# Altium PCB adau1979-fpga.PcbDoc (part 8 of 10)
Units mil, origin at the board's own origin, x right, y up, seen from the top; angles counter-clockwise.
Board outline 7874.02 x 9055.12 mil, 4 copper layers (Top Layer, GND, POWER, Bottom Layer), stack 23.756 mil thick; 636 components, 457 nets, 2015 pads, 4184 vias.
Unrouted connection lines stored in the file: 10.
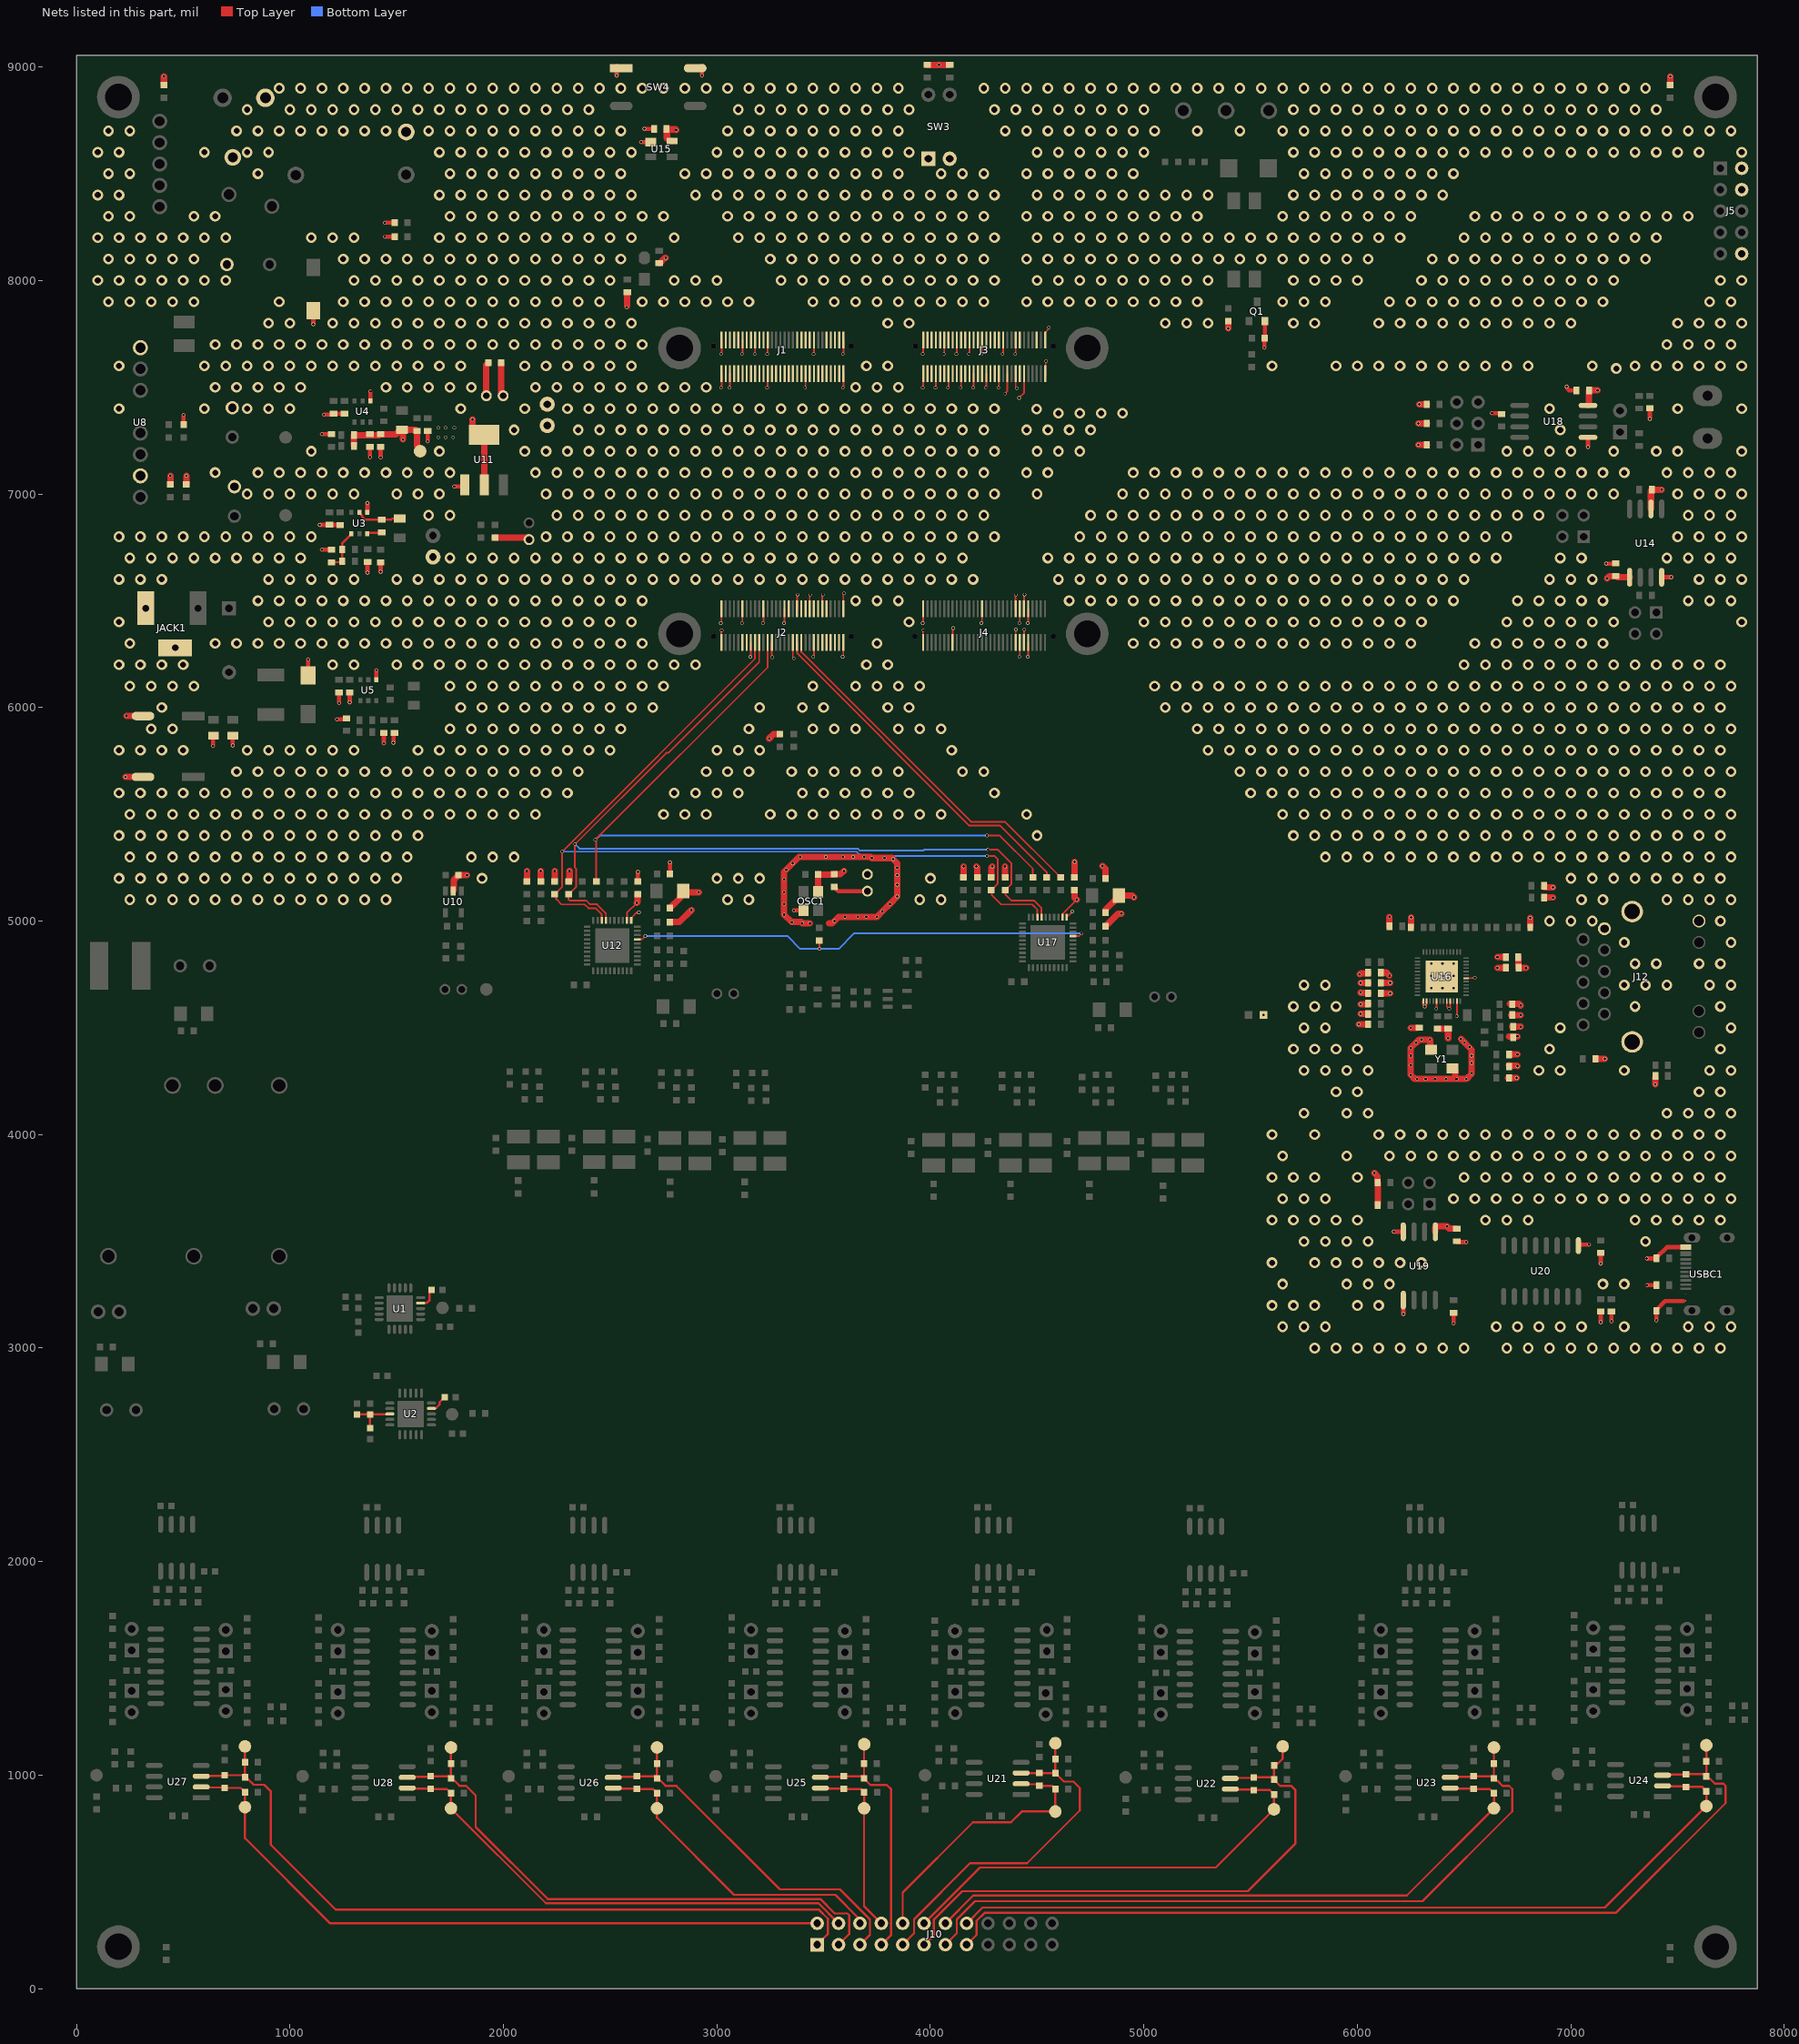
[diagram p7: the nets of this part, all layers, seen from the top]

## Via types
v1: diameter 50, hole 28, Top Layer to Bottom Layer, 3377 vias
v2: diameter 16, hole 12, Top Layer to Bottom Layer, 784 vias
v3: diameter 20, hole 12, Top Layer to Bottom Layer, 14 vias
v4: diameter 16, hole 8, Top Layer to Bottom Layer, 9 vias

## Nets (pads, with @x,y where several pads share a name; then routed paths per layer and width w, separated by ;. In a path a pad name is that pad's centre, name@x,y a point inside that pad or via, vN(x,y) a via of type N, cw(c..) or ccw(c..) an arc to the next point about the centre after c; other vN are vias at no path point) (continued)
GND: C9.1 C10.1 C11.1 C12.1 C14.2 C15.2 C16.1 C17.1 C20.1 C21.1 C22.1 C23.1 C24.1 C25.1 C26.1 C27.1 C38.1 C42.1 C43.2 C44.2 C45.2 C46.2 C47.2 C48.2 C49.1 C50.2 C52.2 C53.1 C54.2 C55.2 C56.2 C57.2 C75.1 C77.1 C78.2 C84.1 C85.1 C86.1 C89.1 C90.1 C91.1 C92.1 C93.1 C94.1 C96.1 C102.1 C103.1 C104.1 C105.1 C106.1 C110.1 C111.1 C113.1 C116.2 C118.1 C119.2 C125.1 C127.1 C128.1 C129.2 C130.2 C132.1 C133.1 C135.1 D1.1 D3.2 J1.1@3592.49,7721.69 J1.2 J1.15 J1.20 J1.37 J1.38 J1.43 J1.49 J1.56 J1.59 J1.60 J2.1@3591.97,6304.37 J2.2 J2.12 J2.15 J2.18 J2.24 J2.25 J2.30 J2.35 J2.40 J2.43 J2.45 J2.50 J2.59 J2.60 J3.1@4537.37,7721.69 J3.2 J3.12 J3.15 J3.16 J3.20 J3.21 J3.24 J3.30 J3.31 J3.36 J3.37 J3.42 J3.43 J3.48 J3.49 J3.54 J3.59 J3.60 J4.9 J4.10 J4.11 J4.12 J4.13 J4.14 J4.15 J4.16 J4.32 J4.45 J4.59 J4.60 J5.2 J5.10 J6.2 J7.2 J12.10 J12.15 J12.16 JACK1.2 JACK1.3 L6.2 LED1.2 OSC1.2 P2.1 Q1.2 R10.2 R11.1 R12.2 R17.1 R18.1 R22.1 R25.2 R40.2 R46.1 R69.1 R74.1 R75.1 R81.2 R93.1 R95.1 R99.1 R106.2 R110.2 R115.2 R120.2 R121.2 R123.1 SW3.1 SW3.2 SW4.1 SW4.4 U3.1 U4.1 U5.1 U8.1 U8.7 U10.2 U11.1 U12.11 U12.18 U14.2 U14.8 U15.1 U16.47 U16.49 U17.11 U17.18 U18.5 U19.4 U19.5 U20.1 USBC1.A1B12 USBC1.B1A12 Y1.2 Y1.4 | length 15673
  Top Layer w8: U12.18@2460.8,5003.2 2460.8,5030.3 2430.99,5060.12 2398.54,5060.12 2380.74,5077.92 2272.08,5077.92 2247.2,5102.8 2247.2,5117.88 R40.2@2240,5125.08 2240.79,5125.08 2251.75,5136.04 2251.75,5136.83 2275.25,5160.33 2275.25,5324.75 v2(2275,5325) 2275,5325.46 3178.58,6229.04 J2.43@3178.58,6304.37 ; U12.11@2598.6,5003.2 2600.1,5004.7 2600.1,5014.95 2623.62,5038.47 2633.47,5038.47 v2(2635,5040) ; J2.59@3020,6295 v2@3020,6357.21 ; v2@3021.1,6399.64 J2.60@3021.1,6461.85 ; v2@3021.62,7502 J1.60@3021.62,7564.21 ; v2@3021.62,7659.48 J1.59@3021.62,7721.69 ; v2@3060.99,7502 J1.56@3060.99,7564.21 ; v2@3119.53,6399.64 J2.50@3119.53,6461.85 ; v2@3120.05,7659.48 J1.49@3120.05,7721.69 ; v2@3158.9,6242.16 J2.45@3158.9,6304.37 ; v2@3179.1,7659.48 J1.43@3179.1,7721.69 ; v2@3217.95,6399.64 J2.40@3217.95,6461.85 ; v2@3238.16,7502 J1.38@3238.16,7564.21 ; v2@3238.16,7659.48 J1.37@3238.16,7721.69 ; J2.35@3257.32,6304.37 3257.32,6239.84 3260,6237.16 v2(3260,6235) ; v2@3316.38,6399.64 J2.30@3316.38,6461.85 ; J2.25@3355.75,6304.37 3355.75,6236.41 3360,6232.16 v2(3360,6230) ; J2.24@3375.43,6461.85 v2@3375.43,6524.06 ; v2@3415.32,7502 J1.20@3415.32,7564.21 ; J2.18@3434.49,6461.85 v2@3434.49,6524.06 ; v2@3454.17,6242.16 J2.15@3454.17,6304.37 ; v2@3454.69,7659.48 J1.15@3454.69,7721.69 ; J2.12@3493.54,6461.85 v2@3493.54,6524.06 ; v2@3591.97,6242.16 J2.1@3591.97,6304.37 ; J2.2@3591.97,6461.85 3591.97,6529.81 3595,6532.84 v2(3595,6535) ; v2@3592.49,7502 J1.2@3592.49,7564.21 ; v2@3592.49,7659.48 J1.1@3592.49,7721.69 ; J4.59@3965,6295 v2@3965,6357.21 ; v2@3965.98,6399.64 J4.60@3965.98,6461.85 ; v2@3966.5,7502 J3.60@3966.5,7564.21 ; v2@3966.5,7659.48 J3.59@3966.5,7721.69 ; v2@4025.56,7502 J3.54@4025.56,7564.21 ; v2@4064.93,7659.48 J3.49@4064.93,7721.69 ; v2@4084.61,7502 J3.48@4084.61,7564.21 ; J4.45@4103.78,6304.37 v2@4103.78,6366.58 ; v2@4123.98,7659.48 J3.43@4123.98,7721.69 ; v2@4143.67,7502 J3.42@4143.67,7564.21 ; v2@4183.04,7659.48 J3.37@4183.04,7721.69 ; v2@4202.72,7502 J3.36@4202.72,7564.21 ; v2@4241.57,6399.64 J4.32@4241.57,6461.85 ; v2@4242.09,7659.48 J3.31@4242.09,7721.69 ; v2@4261.78,7502 J3.30@4261.78,7564.21 ; v2(4265,5305) 4300,5305 4315,5290 4315,5174.29 4285.79,5145.08 R81.2@4285,5145.08 4287.2,5142.88 4287.2,5122.8 4332,5078 4477,5078 4485,5070 4500.6,5054.4 4500.6,5018.4 U17.18@4500.8,5018.2 ; v2@4320.83,7502 J3.24@4320.83,7564.21 ; v2@4340.52,7659.48 J3.21@4340.52,7721.69 ; v2(4350,7470) 4350,7472.16 4360.2,7482.36 J3.20@4360.2,7564.21 ; J4.15@4399.05,6304.37 4399.52,6304.85 4399.52,6364.52 v2(4400,6365) ; J4.16@4399.05,6461.85 v2@4399.05,6524.06 ; J3.16@4399.57,7564.21 4399.57,7502.6 4405,7497.16 v2(4405,7495) ; v2@4399.57,7659.48 J3.15@4399.57,7721.69 ; v2(4415,7450) 4438.94,7473.94 J3.12@4438.94,7564.21 ; v2@4418.74,6242.16 J4.13@4418.74,6304.37 ; v2@4418.74,6399.64 J4.14@4418.74,6461.85 ; J4.11@4438.42,6304.37 4439.21,6305.16 4439.21,6364.21 v2(4440,6365) ; J4.12@4438.42,6461.85 v2@4438.42,6524.06 ; v2@4458.11,6242.16 J4.9@4458.11,6304.37 ; v2@4458.11,6399.64 J4.10@4458.11,6461.85 ; J3.1@4537.49,7729.16 4537.49,7756.27 4553.47,7772.24 4553.47,7778.47 v2(4555,7780) ; J3.2@4540,7555 v2@4540,7617.21 ; U17.11@4638.6,5018.2 v2@4665,5044.6 ; v2(6465,4555) 6465.87,4555.87 U16.47@6465.87,4625.53
  Top Layer w20: C48.2@501.75,7324.92 v2(501.75,7370) ; v2(640,5819.92) C16.1@640,5865 ; v2(732.16,5822.52) C17.1@732.16,5867.6 ; D1.1@1085,6180 v2(1085,6225.08) ; v2(1110,7795) D3.2@1110,7849.41 ; v2(1139.92,6855.47) C10.1@1185,6855.47 1185.24,6855.24 1234.76,6855.24 C9.1@1235,6855 ; v2(1149.92,6739.53) R11.1@1195,6739.53 ; v2(1149.92,7280) R17.1@1195,7280 ; v2(1159.92,7372.01) C20.1@1205,7372.01 ; C20.1@1205,7375.94 C21.1@1255,7375.94 ; v2(1220.39,5945) R18.1@1265.47,5945 ; v2(1230,6021.46) C22.1@1230,6066.54 ; v2(1280,6024.92) C23.1@1280,6070 ; U3.1@1362.87,6912.95 v2(1362.87,6958.03) ; v2(1363.2,6631.39) C12.1@1363.2,6676.47 ; v2(1375,7172.4) C24.1@1375,7217.48 ; U4.1@1377.4,7435 v2(1377.4,7480.08) ; U5.1@1404.8,6130 v2(1404.8,6175.08) ; v2(1425,6635.39) C11.1@1425,6680.47 ; v2(1425,7171.93) C25.1@1425,7217.01 ; v2(1440,5831.46) C26.1@1440,5876.54 ; v2(1445,8205) C46.2@1490.08,8205 ; v2(1445,8270) C45.2@1490.08,8270 ; v2(1485,5835.39) C27.1@1485,5880.47 ; v2(1645,7246.46) LED1.2@1645,7291.54 ; v2(1769.92,7035) U11.1@1815,7035 ; v2(2530,8959.92) SW4.1@2530,9005 ; C78.2@2630,5185 v2(2630,5230) ; v2(2644.92,8647.5) U15.1@2690,8647.5 ; v2(2660.39,8710) C89.1@2705.47,8710 ; R69.1@2779.92,5220 2780,5220.08 v2(2780,5275) ; v2(2930,8959.92) SW4.4@2930,9005 ; v2(3360,5050) 3360.44,5050.44 OSC1.2@3405.5,5050.44 ; C53.1@3550,5158.82 3550.79,5158.82 3569.61,5140 C52.2@3705,5140 ; v2(5564.92,7684.92) R22.1@5564.92,7730 5566.16,7731.24 5566.16,7808.49 Q1.2@5567.4,7809.73 ; v2(6169.92,3545) U19.4@6215,3545 ; v2(6215,3159.92) U19.5@6215,3205 ; v2(6450,3116.46) C113.1@6450,3161.54 ; C116.2@6465,3496.54 v2(6510.08,3496.54) ; v2(6629.92,7378.46) R99.1@6675,7378.46 ; v2(6980.39,7503) 6980.39,7496.72 6992.11,7485 C118.1@7025.47,7485 ; U20.1@7040,3485 v2(7085.08,3485) ; v2(7080,7219.92) U18.5@7080,7265 ; v2(7140,3121.46) C129.2@7140,3166.54 ; v2(7140,3396.46) C128.1@7140,3441.54 ; v2(7164.92,6673.78) C77.1@7210,6673.78 ; v2(7190,3125.39) C130.2@7190,3170.47 ; v2(7355.39,3295) R120.2@7400.47,3295 ; v2(7355.39,3420) R121.2@7400.47,3420 7400.47,3423.94 7449.3,3472.76 USBC1.B1A12@7537.04,3472.76 ; v2(7370,7351.93) R106.2@7370,7397.01 ; v2(7400.47,3129.92) R95.1@7400.47,3175 7400.47,3178.94 7441.93,3220.39 7525.94,3220.39 ; U14.8@7425,6610 v2(7470.08,6610)
  Top Layer w30: v2(230,5675) C14.2@311.89,5675 ; v2(235,5960) C15.2@311.89,5960 ; R12.2@410,8923.39 v2(410,8954.92) ; C42.1@440,7044.92 v2(440,7085) ; C50.2@515,7044.92 v2(515,7085) ; U10.2@1765,5141.2 1768.2,5144.4 1768.2,5192.57 1789.92,5214.29 C38.1@1789.92,5215 ; C38.1@1798.39,5214.29 v2(1829.92,5214.29) ; C57.2@1960,6795.08 2105.45,6795.08 2114.27,6786.26 C56.2@2120,6786.26 ; C55.2@1990,7615 1990,7474.47 1998.74,7465.73 C54.2@1998.74,7460 ; v2@2580,7879.33 R46.1@2580,7941.54 ; C90.1@2779.92,5060 2779.92,5060.71 2828.45,5109.24 2828.45,5121 2842.7,5135.25 2842.95,5135 v2(2915,5135) ; v2(3435,4990) v2(3400,4990) 3395,4995 v2(3350,4995) v2(3315,5030) v2(3315,5080) v2(3315,5135) v2(3315,5195) 3315,5230 v2(3325,5240) v2(3355,5270) 3385,5300 v2(3390,5300) v2(3510,5300) v2(3590,5300) v2(3637.5,5300) v2(3690,5300) 3720,5300 v2(3725,5295) v2(3785,5295) 3820,5295 v2(3825,5290) 3845,5270 v2(3845,5250) v2(3845,5215) v2(3845,5170) v2(3845,5115) v2(3810,5080) v2(3775,5045) v2(3750,5020) v2(3700,5020) v2(3660,5020) v2(3600,5020) 3570,5020 v2(3550,5000) 3540,4990 3525,4990 ; C119.2@4675,5205 C119.2@4675,5205 v2(4675,5277) ; v2(4806.23,5258.31) 4819.92,5244.62 R123.1@4819.92,5200 ; C125.1@4819.92,5040 4819.96,5040.04 4819.96,5052.51 4882.7,5115.25 C135.1@4882.7,5120 ; C135.1@4889.21,5119.37 4945.17,5119.37 v2(4953.22,5111.33) ; v2(6006.54,4516.67) R115.2@6038.07,4516.67 ; C102.1@6121.93,4661.67 v2(6153.46,4661.67) ; C103.1@6121.93,4710 v2(6153.46,4710) ; C104.1@6121.93,4758.33 6136.67,4758.33 v2(6150,4745) ; v2(6250,4500.47) R110.2@6281.54,4500.47 ; R74.1@6250.94,4970 v2(6250.94,5017.28) ; Y1.2@6345,4396.61 6340,4401.61 v2(6340,4445) v2(6300,4445) 6290,4445 v2(6250,4405) v2(6250,4370) v2(6250,4325) v2(6250,4279.39) 6269.39,4260 v2(6415,4260) v2(6465,4260) ; C132.1@6375,4495.47 C133.1@6425,4495.47 ; v2(6425,4451.54) C133.1@6425,4483.07 ; Y1.4@6445,4310 6448.94,4310 6457.56,4301.38 6457.56,4267.44 v2(6465,4260) ; v2(6485,4447.43) 6535,4397.43 v2(6535,4335) v2(6535,4287.5) 6535,4285 v2(6510,4260) v2(6465,4260) ; C85.1@6705.59,4265 C85.1@6709.53,4265 v2(6746.06,4265) ; C84.1@6709.53,4325 6709.53,4323.5 6710.75,4322.28 6747.72,4322.28 v2(6750,4320) ; 6709.53,4460 v2(6750,4460) ; C94.1@6714.59,4612.44 6757.56,4612.44 ; C86.1@6718.46,4375 v2(6750,4375) ; C93.1@6720.75,4560 v2(6765,4560) ; C92.1@6724.53,4505 v2(6765,4505) ; C94.1@6724.53,4612.44 6757.56,4612.44 ; C111.1@6754.06,4831.22 6754.29,4830.98 6754.29,4781.46 C110.1@6754.53,4781.22 v2(6789.53,4781.22) ; v2(6765,4605) 6757.56,4612.44 ; R75.1@6810,4972.72 v2(6810,5015) ; C105.1@6875,5110 v2(6915.47,5110) ; C106.1@6875.7,5157.26 v2(6916.17,5157.26) ; C127.1@7126.93,4355 v2(7158.46,4355) ; U14.2@7375,6930 7375,7013.98 7379.53,7018.5 C75.1@7379.53,7020 v2(7424.61,7020) ; v2(7395.47,4235) R93.1@7395.47,4266.54 ; R10.2@7465,8923.39 v2(7465,8954.92)
  Bottom Layer w8: v2(2275,5325) 3654.73,5325 3674.73,5305 v2(4265,5305)
  other v1: 5800,3000 5900,3000 6000,3000 6100,3000 6200,3000 6300,3000 6400,3000 6500,3000 6700,3000 6800,3000 6900,3000 7000,3000 7100,3000 7200,3000 7300,3000 7400,3000 7500,3000 7600,3000 7700,3000 5650,3100 5750,3100 5850,3100 6650,3100 6750,3100 6850,3100 6950,3100 7050,3100 7250,3100 7550,3100 7650,3100 7750,3100 5600,3200 5700,3200 5800,3200 6000,3200 6100,3200 5650,3300 5950,3300 6050,3300 6150,3300 7150,3300 7250,3300 5600,3400 5800,3400 5900,3400 6000,3400 6100,3400 6200,3400 6300,3400 5750,3500 5850,3500 5950,3500 6050,3500 7350,3500 5600,3600 5700,3600 5800,3600 5900,3600 6000,3600 6600,3600 6700,3600 6800,3600 7300,3600 7400,3600 7500,3600 7600,3600 7700,3600 5650,3700 5750,3700 5850,3700 6450,3700 6550,3700 6650,3700 6750,3700 6850,3700 6950,3700 7050,3700 7150,3700 7250,3700 7350,3700 7450,3700 7550,3700 7650,3700 7750,3700 5600,3800 5700,3800 5800,3800 6000,3800 6500,3800 6600,3800 6700,3800 6800,3800 6900,3800 7000,3800 7100,3800 7200,3800 7300,3800 7400,3800 7500,3800 7600,3800 7700,3800 5650,3900 5950,3900 6150,3900 6250,3900 6350,3900 6450,3900 6550,3900 6650,3900 6750,3900 6850,3900 6950,3900 7050,3900 7150,3900 7250,3900 7350,3900 7450,3900 7550,3900 7650,3900 7750,3900 5600,4000 5800,4000 6100,4000 6200,4000 6300,4000 6400,4000 6500,4000 6600,4000 6700,4000 6800,4000 6900,4000 7000,4000 7100,4000 7200,4000 7300,4000 7400,4000 7500,4000 7600,4000 7700,4000 5750,4100 5950,4100 6050,4100 7450,4100 7550,4100 7650,4100 7750,4100 5900,4200 6000,4200 7600,4200 7700,4200 5750,4300 5850,4300 5950,4300 6050,4300 6850,4300 6950,4300 7250,4300 7650,4300 7750,4300 5700,4400 5800,4400 5900,4400 6000,4400 6900,4400 7700,4400 5750,4500 5850,4500 6950,4500 7750,4500 5700,4600 5800,4600 5900,4600 7300,4600 7700,4600 5750,4700 5850,4700 7250,4700 7350,4700 7450,4700 7650,4700 7750,4700 7300,4800 7400,4800 7600,4800 7700,4800 7250,4900 7750,4900 6900,5000 7000,5000 7100,5000 7700,5000 250,5100 350,5100 450,5100 550,5100 650,5100 750,5100 850,5100 950,5100 1050,5100 1150,5100 1250,5100 1350,5100 1450,5100 3050,5100 3150,5100 3950,5100 4050,5100 7050,5100 7150,5100 7450,5100 7550,5100 7650,5100 7750,5100 200,5200 300,5200 400,5200 500,5200 600,5200 700,5200 800,5200 900,5200 1000,5200 1100,5200 1200,5200 1300,5200 1400,5200 1500,5200 1900,5200 3000,5200 3100,5200 3200,5200 4000,5200 7000,5200 7100,5200 7200,5200 7300,5200 7400,5200 7500,5200 7600,5200 7700,5200 250,5300 350,5300 450,5300 550,5300 650,5300 750,5300 850,5300 950,5300 1050,5300 1150,5300 1250,5300 1350,5300 1450,5300 1550,5300 1850,5300 1950,5300 2050,5300 5850,5300 5950,5300 6050,5300 6150,5300 6250,5300 6350,5300 6450,5300 6550,5300 6650,5300 6750,5300 6850,5300 6950,5300 7050,5300 7150,5300 7250,5300 7350,5300 7450,5300 7550,5300 7650,5300 7750,5300 200,5400 300,5400 400,5400 500,5400 600,5400 700,5400 800,5400 900,5400 1000,5400 1100,5400 1200,5400 1300,5400 1400,5400 1500,5400 1600,5400 4500,5400 5700,5400 5800,5400 5900,5400 6000,5400 6100,5400 6200,5400 6300,5400 6400,5400 6500,5400 6600,5400 6700,5400 6800,5400 6900,5400 7000,5400 7100,5400 7200,5400 7300,5400 7400,5400 7500,5400 7600,5400 7700,5400 250,5500 350,5500 450,5500 550,5500 650,5500 750,5500 850,5500 950,5500 1050,5500 1150,5500 1250,5500 1350,5500 1450,5500 1550,5500 1650,5500 1750,5500 1850,5500 1950,5500 2050,5500 2150,5500 2750,5500 2850,5500 2950,5500 3250,5500 3350,5500 3450,5500 3550,5500 3650,5500 3750,5500 3850,5500 3950,5500 4050,5500 4450,5500 5650,5500 5750,5500 5850,5500 5950,5500 6050,5500 6150,5500 6250,5500 6350,5500 6450,5500 6550,5500 6650,5500 6750,5500 6850,5500 6950,5500 7050,5500 7150,5500 7250,5500 7350,5500 7450,5500 7550,5500 7650,5500 7750,5500 200,5600 300,5600 400,5600 500,5600 600,5600 700,5600 800,5600 900,5600 1000,5600 1100,5600 1200,5600 1300,5600 1400,5600 1500,5600 1600,5600 1700,5600 1800,5600 1900,5600 2000,5600 2100,5600 2200,5600 2300,5600 2800,5600 2900,5600 3000,5600 3100,5600 3400,5600 3500,5600 3600,5600 3700,5600 3800,5600 3900,5600 4300,5600 5500,5600 5600,5600 5700,5600 5800,5600 5900,5600 6000,5600 6100,5600 6200,5600 6300,5600 6400,5600 6500,5600 6600,5600 6700,5600 6800,5600 6900,5600 7000,5600 7100,5600 7200,5600 7300,5600 7400,5600 7500,5600 7600,5600 7700,5600 750,5700 850,5700 950,5700 1050,5700 1150,5700 1250,5700 1350,5700 1450,5700 1550,5700 1650,5700 1750,5700 1850,5700 1950,5700 2050,5700 2150,5700 2250,5700 2350,5700 2950,5700 3050,5700 3150,5700 3350,5700 3450,5700 3550,5700 3650,5700 3750,5700 3850,5700 4150,5700 4250,5700 5450,5700 5550,5700 5650,5700 5750,5700 5850,5700 5950,5700 6050,5700 6150,5700 6250,5700 6350,5700 6450,5700 6550,5700 6650,5700 6750,5700 6850,5700 6950,5700 7050,5700 7150,5700 7250,5700 7350,5700 7450,5700 7550,5700 7650,5700 7750,5700 200,5800 300,5800 400,5800 500,5800 800,5800 900,5800 1000,5800 1100,5800 1200,5800 1300,5800 1600,5800 1700,5800 1800,5800 1900,5800 2000,5800 2100,5800 2200,5800 2300,5800 2400,5800 2500,5800 3000,5800 3100,5800 3200,5800 4100,5800 5300,5800 5400,5800 5500,5800 5600,5800 5700,5800 5800,5800 5900,5800 6000,5800 6100,5800 6200,5800 6300,5800 6400,5800 6500,5800 6600,5800 6700,5800 6800,5800 6900,5800 7000,5800 7100,5800 7200,5800 7300,5800 7400,5800 7500,5800 7600,5800 7700,5800 350,5900 450,5900 1750,5900 1850,5900 1950,5900 2050,5900 2150,5900 2250,5900 2350,5900 2450,5900 2550,5900 3150,5900 3450,5900 3550,5900 3650,5900 3850,5900 3950,5900 4050,5900 5250,5900 5350,5900 5450,5900 5550,5900 5650,5900 5750,5900 5850,5900 5950,5900 6050,5900 6150,5900 6250,5900 6350,5900 6450,5900 6550,5900 6650,5900 6750,5900 6850,5900 6950,5900 7050,5900 7150,5900 7250,5900 7350,5900 7450,5900 7550,5900 7650,5900 7750,5900 400,6000 1800,6000 1900,6000 2000,6000 2100,6000 2200,6000 2300,6000 2400,6000 2500,6000 2600,6000 2700,6000 3200,6000 3400,6000 3500,6000 3800,6000 3900,6000 5100,6000 5200,6000 5300,6000 5400,6000 5500,6000 5600,6000 5700,6000 5800,6000 5900,6000 6000,6000 6100,6000 6200,6000 6300,6000 6400,6000 6500,6000 6600,6000 6700,6000 6800,6000 6900,6000 7000,6000 7100,6000 7200,6000 7300,6000 7400,6000 7500,6000 7600,6000 7700,6000 250,6100 350,6100 450,6100 550,6100 1750,6100 1850,6100 1950,6100 2050,6100 2150,6100 2250,6100 2350,6100 2450,6100 2550,6100 2650,6100 2750,6100 3450,6100 3650,6100 3750,6100 3850,6100 3950,6100 5050,6100 5150,6100 5250,6100 5350,6100 5450,6100 5550,6100 5650,6100 5750,6100 5850,6100 5950,6100 6050,6100 6150,6100 6250,6100 6350,6100 6450,6100 6550,6100 6650,6100 6750,6100 6850,6100 6950,6100 7050,6100 7150,6100 7250,6100 7350,6100 7450,6100 7550,6100 7650,6100 7750,6100 200,6200 300,6200 400,6200 500,6200 1200,6200 1300,6200 1500,6200 1600,6200 1700,6200 1800,6200 1900,6200 2000,6200 2100,6200 2200,6200 2300,6200 2400,6200 2500,6200 2600,6200 2700,6200 2800,6200 2900,6200 3700,6200 3800,6200 6500,6200 6600,6200 6700,6200 6800,6200 6900,6200 7000,6200 7100,6200 7200,6200 7300,6200 7400,6200 7500,6200 7600,6200 7700,6200 250,6300 650,6300 750,6300 850,6300 950,6300 1050,6300 1150,6300 1250,6300 1350,6300 1450,6300 1550,6300 1650,6300 1750,6300 1850,6300 1950,6300 2050,6300 2150,6300 2250,6300 2350,6300 2450,6300 2550,6300 2650,6300 3750,6300 4950,6300 5050,6300 5150,6300 5250,6300 5350,6300 5450,6300 5550,6300 5650,6300 5750,6300 5850,6300 5950,6300 6050,6300 6150,6300 6250,6300 6550,6300 6650,6300 6750,6300 6850,6300 6950,6300 7050,6300 7150,6300 200,6400 900,6400 1000,6400 1100,6400 1200,6400 1300,6400 1400,6400 1500,6400 1600,6400 1700,6400 1800,6400 1900,6400 2000,6400 2100,6400 2200,6400 2300,6400 2400,6400 2500,6400 2600,6400 3900,6400 5000,6400 5100,6400 5200,6400 5300,6400 5400,6400 5500,6400 5600,6400 5700,6400 5800,6400 5900,6400 6000,6400 6100,6400 6200,6400 6300,6400 6700,6400 6800,6400 6900,6400 7000,6400 7100,6400 7200,6400 7800,6400 850,6500 950,6500 1050,6500 1150,6500 1250,6500 1350,6500 1450,6500 1550,6500 1650,6500 1750,6500 1850,6500 1950,6500 2050,6500 2150,6500 2250,6500 2350,6500 2450,6500 2550,6500 2650,6500 3650,6500 3750,6500 3850,6500 4650,6500 4750,6500 4850,6500 4950,6500 5050,6500 5150,6500 5250,6500 5350,6500 5450,6500 5550,6500 5650,6500 5750,6500 5850,6500 5950,6500 6050,6500 6150,6500 6250,6500 6350,6500 6450,6500 6750,6500 6850,6500 6950,6500 7050,6500 7150,6500 7550,6500 7650,6500 7750,6500 200,6600 300,6600 400,6600 900,6600 1000,6600 1100,6600 1200,6600 1300,6600 1500,6600 1600,6600 1700,6600 1800,6600 1900,6600 2000,6600 2100,6600 2200,6600 2300,6600 2400,6600 2500,6600 2600,6600 2700,6600 2800,6600 2900,6600 3000,6600 3100,6600 3200,6600 3300,6600 3400,6600 3500,6600 3600,6600 3700,6600 3800,6600 3900,6600 4000,6600 4100,6600 4200,6600 4600,6600 4700,6600 4800,6600 4900,6600 5000,6600 5100,6600 5200,6600 5300,6600 5400,6600 5500,6600 5600,6600 5700,6600 5800,6600 5900,6600 6000,6600 6100,6600 6200,6600 6300,6600 6400,6600 6500,6600 6900,6600 7000,6600 7100,6600 7600,6600 7700,6600 7800,6600 250,6700 350,6700 450,6700 550,6700 650,6700 750,6700 850,6700 950,6700 1050,6700 1750,6700 1850,6700 1950,6700 2050,6700 2150,6700 2250,6700 2350,6700 2450,6700 2550,6700 2650,6700 2750,6700 2850,6700 2950,6700 3050,6700 3150,6700 3250,6700 3350,6700 3450,6700 3550,6700 3650,6700 3750,6700 3850,6700 3950,6700 4050,6700 4150,6700 4550,6700 4650,6700 4750,6700 4850,6700 4950,6700 5050,6700 5150,6700 5250,6700 5350,6700 5450,6700 5550,6700 5650,6700 5750,6700 5850,6700 5950,6700 6050,6700 6150,6700 6250,6700 6350,6700 6450,6700 6550,6700 6650,6700 6950,6700 7050,6700 7450,6700 7550,6700 7650,6700 7750,6700 200,6800 300,6800 400,6800 500,6800 600,6800 700,6800 800,6800 900,6800 1000,6800 1100,6800 2200,6800 2300,6800 2400,6800 2500,6800 2600,6800 2700,6800 2800,6800 2900,6800 3000,6800 3100,6800 3200,6800 3300,6800 3400,6800 3500,6800 3600,6800 3700,6800 3800,6800 3900,6800 4000,6800 4100,6800 4200,6800 4300,6800 4700,6800 4800,6800 4900,6800 5000,6800 5100,6800 5200,6800 5300,6800 5400,6800 5500,6800 5600,6800 5700,6800 5800,6800 5900,6800 6000,6800 6100,6800 6200,6800 6300,6800 6400,6800 6500,6800 6600,6800 6700,6800 7500,6800 7600,6800 7700,6800 7800,6800 1650,6900 1750,6900 2250,6900 2350,6900 2450,6900 2550,6900 2650,6900 2750,6900 2850,6900 2950,6900 3050,6900 3150,6900 3250,6900 3350,6900 3450,6900 3550,6900 3650,6900 3750,6900 3850,6900 3950,6900 4050,6900 4150,6900 4250,6900 4750,6900 4850,6900 4950,6900 5050,6900 5150,6900 5250,6900 5350,6900 5450,6900 5550,6900 5650,6900 5750,6900 5850,6900 5950,6900 6050,6900 6150,6900 6250,6900 6350,6900 6450,6900 6550,6900 6650,6900 6750,6900 6850,6900 7550,6900 7650,6900 7750,6900 800,7000 900,7000 1000,7000 1100,7000 1200,7000 1300,7000 1500,7000 1600,7000 1700,7000 2200,7000 2300,7000 2400,7000 2500,7000 2600,7000 2700,7000 2800,7000 2900,7000 3000,7000 3100,7000 3200,7000 3300,7000 3400,7000 3500,7000 3600,7000 3700,7000 3800,7000 3900,7000 4000,7000 4100,7000 4200,7000 4300,7000 4500,7000 4900,7000 5000,7000 5100,7000 5200,7000 5300,7000 5400,7000 5500,7000 5600,7000 5700,7000 5800,7000 5900,7000 6000,7000 6100,7000 6200,7000 6300,7000 6400,7000 6500,7000 6600,7000 6700,7000 6800,7000 6900,7000 7000,7000 7100,7000 7200,7000 7500,7000 7600,7000 7700,7000 7800,7000 650,7100 850,7100 950,7100 1050,7100 1150,7100 1250,7100 1350,7100 1450,7100 1550,7100 1650,7100 1750,7100 2150,7100 2250,7100 2350,7100 2450,7100 2550,7100 2650,7100 2750,7100 2850,7100 2950,7100 3050,7100 3150,7100 3250,7100 3350,7100 3450,7100 3550,7100 3650,7100 3750,7100 3850,7100 3950,7100 4050,7100 4150,7100 4250,7100 4450,7100 4550,7100 4950,7100 5050,7100 5150,7100 5250,7100 5350,7100 5450,7100 5550,7100 5650,7100 5750,7100 5850,7100 5950,7100 6050,7100 6150,7100 6250,7100 6350,7100 6450,7100 6550,7100 6650,7100 6750,7100 6850,7100 6950,7100 7050,7100 7150,7100 7250,7100 7450,7100 7550,7100 7650,7100 7750,7100 1100,7200 1700,7200 2100,7200 2200,7200 2300,7200 2400,7200 2500,7200 2600,7200 2700,7200 2800,7200 2900,7200 3000,7200 3100,7200 3200,7200 3300,7200 3400,7200 3500,7200 3600,7200 3700,7200 3800,7200 3900,7200 4000,7200 4100,7200 4200,7200 4300,7200 4500,7200 4600,7200 4700,7200 6700,7200 6800,7200 6900,7200 7000,7200 7200,7200 7400,7200 7500,7200 7800,7200 2050,7300 2350,7300 2450,7300 2550,7300 2650,7300 2750,7300 2850,7300 2950,7300 3050,7300 3150,7300 3250,7300 3350,7300 3450,7300 3550,7300 3650,7300 3750,7300 3850,7300 3950,7300 4050,7300 4150,7300 4250,7300 4450,7300 4550,7300 4650,7300 4750,7300 6950,7300 4600,7377.66 4700,7377.66 4800,7377.66 4900,7377.66 4497.75,7397.75 200,7400 600,7400 800,7400 900,7400 1000,7400 1800,7400 2100,7400 2300,7400 2400,7400 2500,7400 2600,7400 2700,7400 2800,7400 2900,7400 3000,7400 3100,7400 3200,7400 3300,7400 3400,7400 3500,7400 3600,7400 3700,7400 3800,7400 3900,7400 4000,7400 4100,7400 4200,7400 4300,7400 6900,7400 7500,7400 7800,7400 650,7500 750,7500 850,7500 950,7500 1050,7500 1450,7500 1550,7500 1650,7500 1750,7500 1850,7500 2150,7500 2250,7500 2350,7500 2450,7500 2550,7500 2650,7500 2750,7500 2850,7500 2950,7500 3650,7500 3750,7500 3850,7500 7212.25,7587.75 200,7600 600,7600 700,7600 800,7600 900,7600 1000,7600 1100,7600 1200,7600 1300,7600 1400,7600 1500,7600 1600,7600 1700,7600 1800,7600 2100,7600 2200,7600 2300,7600 2400,7600 2500,7600 2600,7600 3700,7600 3800,7600 5600,7600 5900,7600 6000,7600 6100,7600 6200,7600 6300,7600 6400,7600 6500,7600 6600,7600 6700,7600 6800,7600 7100,7600 7300,7600 7400,7600 7500,7600 7600,7600 7700,7600 7800,7600 650,7700 750,7700 850,7700 950,7700 1050,7700 1150,7700 1250,7700 1350,7700 1450,7700 1550,7700 1650,7700 1750,7700 1850,7700 1950,7700 2050,7700 2150,7700 2250,7700 2350,7700 2450,7700 2550,7700 2650,7700 7450,7700 7550,7700 7650,7700 7750,7700 900,7800 1000,7800 1200,7800 1300,7800 1400,7800 1500,7800 1600,7800 1700,7800 1800,7800 1900,7800 2000,7800 2100,7800 2200,7800 2300,7800 2400,7800 2500,7800 2600,7800 3800,7800 3900,7800 5100,7800 5200,7800 5300,7800 5700,7800 5800,7800 6100,7800 6200,7800 6300,7800 6400,7800 6500,7800 6600,7800 6700,7800 6800,7800 6900,7800 7000,7800 7500,7800 7600,7800 7700,7800 7800,7800 150,7900 250,7900 350,7900 450,7900 550,7900 950,7900 1250,7900 1350,7900 1450,7900 1550,7900 1650,7900 1750,7900 1850,7900 1950,7900 2050,7900 2150,7900 2250,7900 2350,7900 2450,7900 2650,7900 2750,7900 2850,7900 2950,7900 3050,7900 3150,7900 3450,7900 3550,7900 3650,7900 3750,7900 3850,7900 3950,7900 4050,7900 4150,7900 4250,7900 4450,7900 4550,7900 4650,7900 4750,7900 4850,7900 4950,7900 5050,7900 5150,7900 5250,7900 5650,7900 5750,7900 5850,7900 6150,7900 6250,7900 6350,7900 6450,7900 6550,7900 6650,7900 6750,7900 6850,7900 6950,7900 7050,7900 7150,7900 7650,7900 7750,7900 100,8000 200,8000 300,8000 400,8000 500,8000 600,8000 700,8000 1300,8000 1400,8000 1500,8000 1600,8000 1700,8000 1800,8000 1900,8000 2000,8000 2100,8000 2200,8000 2300,8000 2400,8000 2500,8000 2800,8000 2900,8000 3000,8000 3300,8000 3400,8000 3500,8000 3600,8000 3700,8000 3800,8000 3900,8000 4000,8000 4100,8000 4200,8000 4300,8000 4500,8000 4600,8000 4700,8000 4800,8000 4900,8000 5000,8000 5100,8000 5200,8000 5300,8000 5700,8000 5800,8000 5900,8000 6000,8000 6300,8000 6400,8000 6500,8000 6600,8000 6700,8000 6800,8000 6900,8000 7000,8000 7100,8000 7200,8000 7700,8000 7800,8000 150,8100 250,8100 350,8100 450,8100 550,8100 1250,8100 1350,8100 1450,8100 1550,8100 1650,8100 1750,8100 1850,8100 1950,8100 2050,8100 2150,8100 2250,8100 2350,8100 2450,8100 2550,8100 3250,8100 3350,8100 3450,8100 3550,8100 3650,8100 3750,8100 3850,8100 3950,8100 4050,8100 4150,8100 4250,8100 4450,8100 4550,8100 4650,8100 4750,8100 4850,8100 4950,8100 5050,8100 5150,8100 5250,8100 5350,8100 5450,8100 5550,8100 5650,8100 5750,8100 5850,8100 5950,8100 6050,8100 6350,8100 6450,8100 6550,8100 6650,8100 6750,8100 6850,8100 6950,8100 7050,8100 7150,8100 7250,8100 7350,8100 100,8200 200,8200 300,8200 400,8200 500,8200 600,8200 700,8200 1100,8200 1200,8200 1300,8200 1700,8200 1800,8200 1900,8200 2000,8200 2100,8200 2200,8200 2300,8200 2400,8200 2500,8200 2600,8200 2800,8200 3100,8200 3200,8200 3300,8200 3400,8200 3500,8200 3600,8200 3700,8200 3800,8200 3900,8200 4000,8200 4100,8200 4200,8200 4300,8200 4500,8200 4600,8200 4700,8200 4800,8200 4900,8200 5000,8200 5100,8200 5200,8200 5300,8200 5400,8200 5500,8200 5600,8200 5700,8200 5800,8200 5900,8200 6000,8200 6100,8200 6200,8200 6500,8200 6600,8200 6700,8200 6800,8200 6900,8200 7000,8200 7100,8200 7200,8200 7300,8200 7400,8200 150,8300 250,8300 550,8300 650,8300 1750,8300 1850,8300 1950,8300 2050,8300 2150,8300 2250,8300 2350,8300 2450,8300 2550,8300 2650,8300 2750,8300 3050,8300 3150,8300 3250,8300 3350,8300 3450,8300 3550,8300 3650,8300 3750,8300 3850,8300 3950,8300 4050,8300 4150,8300 4250,8300 4450,8300 4550,8300 4650,8300 4750,8300 4850,8300 4950,8300 5050,8300 5150,8300 5250,8300 5650,8300 5750,8300 5850,8300 5950,8300 6050,8300 6150,8300 6250,8300 6550,8300 6650,8300 6750,8300 6850,8300 6950,8300 7050,8300 7150,8300 7250,8300 7350,8300 7450,8300 7550,8300 100,8400 200,8400 1700,8400 1800,8400 1900,8400 2000,8400 2100,8400 2200,8400 2300,8400 2400,8400 2500,8400 2600,8400 2900,8400 3000,8400 3100,8400 3200,8400 3300,8400 3400,8400 3500,8400 3600,8400 3700,8400 3800,8400 3900,8400 4000,8400 4100,8400 4200,8400 4300,8400 4500,8400 4600,8400 4700,8400 4800,8400 4900,8400 5000,8400 5100,8400 5200,8400 5300,8400 5700,8400 5800,8400 5900,8400 6000,8400 6100,8400 6200,8400 6300,8400 6400,8400 150,8500 250,8500 850,8500 1750,8500 1850,8500 1950,8500 2050,8500 2150,8500 2250,8500 2350,8500 2450,8500 2550,8500 2850,8500 2950,8500 3050,8500 3150,8500 3250,8500 3350,8500 3450,8500 3550,8500 3650,8500 3750,8500 3850,8500 4050,8500 4150,8500 4250,8500 4450,8500 4550,8500 4650,8500 4750,8500 4850,8500 4950,8500 5750,8500 5850,8500 5950,8500 6050,8500 6150,8500 6250,8500 6350,8500 6450,8500 100,8600 200,8600 600,8600 800,8600 900,8600 1700,8600 1800,8600 1900,8600 2000,8600 2100,8600 2200,8600 2300,8600 2400,8600 2500,8600 2600,8600 3000,8600 3100,8600 3200,8600 3300,8600 3400,8600 3500,8600 3600,8600 3700,8600 3800,8600 3900,8600 4500,8600 4600,8600 4700,8600 4800,8600 4900,8600 5000,8600 5700,8600 5800,8600 5900,8600 6000,8600 6100,8600 6200,8600 6300,8600 6400,8600 6500,8600 6600,8600 6700,8600 6800,8600 6900,8600 7000,8600 7100,8600 7200,8600 7300,8600 7400,8600 7500,8600 7600,8600 7800,8600 150,8700 250,8700 750,8700 850,8700 950,8700 1050,8700 1150,8700 1250,8700 1350,8700 1450,8700 1650,8700 1750,8700 1850,8700 1950,8700 2050,8700 2150,8700 2250,8700 2350,8700 2450,8700 2550,8700 3050,8700 3150,8700 3250,8700 3350,8700 3450,8700 3550,8700 3650,8700 3750,8700 3850,8700 4350,8700 4450,8700 4550,8700 4650,8700 4750,8700 4850,8700 4950,8700 5050,8700 5250,8700 5450,8700 5650,8700 5750,8700 5850,8700 5950,8700 6050,8700 6150,8700 6250,8700 6350,8700 6450,8700 6550,8700 6650,8700 6750,8700 6850,8700 6950,8700 7050,8700 7150,8700 7250,8700 7350,8700 7450,8700 7550,8700 7650,8700 7750,8700 800,8800 1000,8800 1100,8800 1200,8800 1300,8800 1400,8800 1500,8800 1600,8800 1700,8800 1800,8800 1900,8800 2000,8800 2100,8800 2200,8800 2300,8800 2400,8800 3100,8800 3200,8800 3300,8800 3400,8800 3500,8800 3600,8800 3700,8800 3800,8800 3900,8800 4300,8800 4400,8800 4500,8800 4600,8800 4700,8800 4800,8800 4900,8800 5000,8800 5700,8800 5800,8800 5900,8800 6000,8800 6100,8800 6200,8800 6300,8800 6400,8800 6500,8800 6600,8800 6700,8800 6800,8800 6900,8800 7000,8800 7100,8800 7200,8800 7300,8800 7400,8800 950,8900 1050,8900 1150,8900 1250,8900 1350,8900 1450,8900 1550,8900 1650,8900 1750,8900 1850,8900 1950,8900 2050,8900 2150,8900 2250,8900 2350,8900 2450,8900 2550,8900 2650,8900 2750,8900 2850,8900 2950,8900 3050,8900 3150,8900 3250,8900 3350,8900 3450,8900 3550,8900 3650,8900 3750,8900 3850,8900 4250,8900 4350,8900 4450,8900 4550,8900 4650,8900 4750,8900 4850,8900 4950,8900 5050,8900 5150,8900 5250,8900 5350,8900 5450,8900 5550,8900 5650,8900 5750,8900 5850,8900 5950,8900 6050,8900 6150,8900 6250,8900 6350,8900 6450,8900 6550,8900 6650,8900 6750,8900 6850,8900 6950,8900 7050,8900 7150,8900 7250,8900 7350,8900
  other v2: 6280,4260 6320,4260 6365,4260 6535,4370 6525,4410 6275,4430 6501.85,4430.57 5560,4560 6345.9,4685.9 6398.4,4685.9 6450.9,4685.9 6345.9,4743.4 6398.4,4743.4 6450.9,4743.4 6345.9,4800.9 6398.4,4800.9 6450.9,4800.9 4665,5044.75 3156.42,6237.52 3451.69,6237.52 3589.49,6237.52 4416.26,6237.52 4455.63,6237.52 3022.48,6361.85 3967.48,6361.85 4106.26,6371.22 3018.62,6395 3117.05,6395 3215.47,6395 3313.9,6395 3963.5,6395 4239.09,6395 4416.26,6395 4455.63,6395 3377.91,6528.7 3436.97,6528.7 3496.02,6528.7 4401.53,6528.7 4440.9,6528.7 3019.14,7497.36 3058.51,7497.36 3235.68,7497.36 3412.84,7497.36 3590.01,7497.36 3964.02,7497.36 4023.08,7497.36 4082.13,7497.36 4141.19,7497.36 4200.24,7497.36 4259.3,7497.36 4318.35,7497.36 4542.48,7621.85 3019.14,7654.84 3117.57,7654.84 3176.62,7654.84 3235.68,7654.84 3452.21,7654.84 3590.01,7654.84 3964.02,7654.84 4062.45,7654.84 4121.5,7654.84 4180.56,7654.84 4239.61,7654.84 4338.04,7654.84 4397.09,7654.84 2577.52,7874.69
H15: J2.28
H16: J1.51
H17: J1.53
H18: J1.57
H20: J2.21 R97.2 | length 1696.3
  Top Layer w8: J2.21@3395.12,6304.37 3395.88,6303.61 3395.88,6259.2 4190.08,5465 4349.06,5465 4609.21,5204.84 R97.2@4610,5204.84
IO1+: 23.1 C168.2 J10.1 R131.2 R153.1 U27.3 | length 3650.1
  Top Layer w10: U27.3@584.41,995 586.87,997.46 691.95,997.46 R131.2@694.41,999.92 779.48,999.92 R153.1@789.41,990 ; 23.1@789.41,1135 789.41,1060 R153.1@789.41,990 ; J10.1@3470,206 3520,256 3520,327.72 3477.72,370 1215.51,370 910,675.51 910,925 880,955 830,955 805.75,979.25 799.37,979.25 789.41,989.21 R153.1@789.41,990
IO1-: 6.1 C147.1 J10.2 R131.1 U27.2 | length 3276.5
  Top Layer w10: U27.2@584.41,945 586.87,942.54 691.95,942.54 R131.1@694.41,940.08 770.19,940.08 789.48,920.78 C147.1@789.48,920 789.45,919.96 6.1@789.41,850 ; 6.1@789.41,850 6.1@789.41,850 ; J10.2@3470,306 1189,306 789.45,705.55 6.1@789.41,850
IO2+: 24.1 C170.2 J10.3 R132.2 R156.1 U28.3 | length 2733.1
  Top Layer w10: U28.3@1549.41,990 1551.87,992.46 1656.95,992.46 R132.2@1659.41,994.92 1744.48,994.92 R156.1@1754.41,985 ; 24.1@1754.41,1130 1754.41,1055 R156.1@1754.41,985 ; J10.3@3570,206 3620,256 3620,344.14 3611.65,352.5 3551.79,352.5 3484.28,420 2207.69,420 1870,757.69 1870,905 1840.29,934.71 1840.29,935.3 1825.59,950 1795,950 1770.75,974.25 1764.37,974.25 1754.41,984.21 R156.1@1754.41,985
IO2-: 8.1 C148.1 J10.4 R132.1 U28.2 | length 2324.8
  Top Layer w10: U28.2@1549.41,940 1551.87,937.54 1656.95,937.54 R132.1@1659.41,935.08 1735.19,935.08 1754.48,915.78 C148.1@1754.48,915 1754.45,914.96 8.1@1754.41,845 8.1@1754.41,845 2199.4,400 3476,400 J10.4@3570,306
IO3+: 21.1 C166.2 J10.5 R129.2 R147.1 U26.3 | length 1765.5
  Top Layer w10: U26.3@2514.41,990 2516.87,992.46 2621.95,992.46 R129.2@2624.41,994.92 2709.48,994.92 R147.1@2719.41,985 ; 21.1@2719.41,1130 R147.1@2719.41,985 ; J10.5@3670,206 3716.5,252.5 3716.5,325.26 3576.76,465 3295,465 2810,950 2760,950 2735.75,974.25 2729.37,974.25 2719.41,984.21 R147.1@2719.41,985
IO3-: 4.1 C144.1 J10.6 R129.1 U26.2 | length 1496.5
  Top Layer w10: U26.2@2514.41,940 2516.87,937.54 2621.95,937.54 R129.1@2624.41,935.08 2700.19,935.08 2719.48,915.78 C144.1@2719.48,915 2719.45,914.96 4.1@2719.41,845 4.1@2719.41,845 2719.41,800.59 3080,440 3554.28,440 3659.86,334.42 3659.86,316.14 J10.6@3670,306
IO4+: 22.1 C164.2 J10.7 R130.2 R149.1 U25.3 | length 1251.8
  Top Layer w10: U25.3@3484.41,990 3486.87,992.46 3591.95,992.46 R130.2@3594.41,994.92 3679.48,994.92 R149.1@3689.41,985 ; 22.1@3689.41,1130 R149.1@3689.41,985 ; J10.7@3770,206 3816.5,252.5 3816.5,933.5 3795.75,954.25 3719.37,954.25 3689.41,984.21 R149.1@3689.41,985
IO4-: 5.1 C145.1 J10.8 R130.1 U25.2 | length 861.2
  Top Layer w10: U25.2@3484.41,940 3486.87,937.54 3591.95,937.54 R130.1@3594.41,935.08 3675.2,935.08 3685.16,925.11 3685.16,925 3689.45,920.71 5.1@3689.41,845 5.1@3689.41,845 3689.41,386.59 J10.8@3770,306
IO5+: 17.1 C157.2 J10.9 R125.2 R134.1 U21.3 | length 1678.6
  Top Layer w10: J10.9@3870,206 3923.5,259.5 3923.5,325.26 4185.83,587.58 4452.58,587.58 4700,835 4700,940 4670,970 4625.08,970 4595.83,999.25 4595.04,999.25 4585.08,1009.21 R134.1@4585.08,1010 ; U21.3@4425,1010 U21.3@4425,1010 4509.96,1009.96 R125.2@4510,1009.92 4585,1009.92 R134.1@4585.08,1010 ; 17.1@4585,1150 17.1@4585,1150 4585.04,1075 4585.04,1010.04 R134.1@4585.08,1010
IO5-: 1.1 C140.1 J10.10 R125.1 U21.2 | length 1292.3
  Top Layer w10: J10.10@3870,306 3870,450 4199.25,779.25 4377.54,779.25 4428.28,830 1.1@4585,830 1.1@4585,830 4585.04,934.96 C140.1@4585.08,935 4585.08,935.79 4575.12,945.75 4573.59,945.75 4569.26,950.08 R125.1@4510,950.08 4502.76,957.32 4427.68,957.32 U21.2@4425,960
IO6+: 18.1 C159.2 J10.11 R126.2 R138.1 U22.3 | length 2733.1
  Top Layer w10: J10.11@3970,206 4016.5,252.5 4016.5,324.21 4149.21,456.93 5486.93,456.93 5710,680 5710,930 5690.75,949.25 5639.37,949.25 5609.41,979.21 R138.1@5609.41,980 ; U22.3@5404.41,985 5406.87,987.46 5511.95,987.46 R126.2@5514.41,989.92 5599.48,989.92 R138.1@5609.41,980 ; 18.1@5650,1135 5650,1077 5609.41,1036.41 R138.1@5609.41,980
IO6-: 2.1 C141.1 J10.12 R126.1 U22.2 | length 2146.5
  Top Layer w10: J10.12@3970,306 4231.58,567.58 5336.99,567.58 2.1@5609.41,840 2.1@5609.41,840 5609.45,909.96 C141.1@5609.48,910 5609.48,910.78 5590.19,930.08 R126.1@5514.41,930.08 5511.95,932.54 5406.87,932.54 U22.2@5404.41,935
IO7+: 19.1 C160.2 J10.13 R127.2 R140.1 U23.3 | length 3520.5
  Top Layer w10: J10.13@4070,206 4123.5,259.5 4123.5,325.26 4208.24,410 6305,410 6725.29,830.29 6725.29,935.3 6710.59,950 6680,950 6655.75,974.25 6649.37,974.25 6639.41,984.21 R140.1@6639.41,985 ; U23.3@6434.41,990 6436.87,992.46 6541.95,992.46 R127.2@6544.41,994.92 6629.48,994.92 R140.1@6639.41,985 ; 19.1@6639.41,1130 R140.1@6639.41,985
IO7-: 7.1 C142.1 J10.14 R127.1 U23.2 | length 3078.6
  Top Layer w10: J10.14@4070,306 4200.93,436.93 6231.34,436.93 7.1@6639.41,845 7.1@6639.41,845 6639.45,914.96 C142.1@6639.48,915 6639.48,915.78 6620.19,935.08 R127.1@6544.41,935.08 6541.95,937.54 6436.87,937.54 U23.2@6434.41,940
IO8+: 20.1 C162.2 J10.15 R128.2 R145.1 U24.3 | length 4413.5
  Top Layer w10: J10.15@4170,206 4216.5,252.5 4216.5,318.25 4253.24,355 7210,355 7724.29,869.29 7724.29,950.15 7714.44,960 7675,960 7650.75,984.25 7644.37,984.25 7634.41,994.21 R145.1@7634.41,995 ; U24.3@7429.41,1000 7431.87,1002.46 7536.95,1002.46 R128.2@7539.41,1004.92 7624.48,1004.92 R145.1@7634.41,995 ; 20.1@7634.41,1140 R145.1@7634.41,995
IO8-: 3.1 C143.1 J10.16 R128.1 U24.2 | length 3977.7
  Top Layer w10: J10.16@4170,306 4244,380 7159.41,380 3.1@7634.41,855 3.1@7634.41,855 7634.45,924.96 C143.1@7634.48,925 7634.48,925.78 7615.19,945.08 R128.1@7539.41,945.08 7536.95,947.54 7431.87,947.54 U24.2@7429.41,950
IO13_L6N: J3.14
IO13_L11N: J3.56
IO13_L11P: J3.58
IO13_L12N: J3.50
IO13_L12P: J3.52
IO13_L13N: J3.44
IO13_L13P: J3.46
IO13_L14N: J3.38
IO13_L14P: J3.40
IO13_L15N: J3.32
IO13_L15P: J3.34
IO13_L16N: J3.55
IO13_L16P: J3.57
IO13_L17N: J3.51
IO13_L17P: J3.53
IO13_L18N: J3.45
IO13_L18P: J3.47
IO13_L19N: J3.39
IO13_L19P: J3.41
IO13_L20N: J3.33
IO13_L20P: J3.35
IO13_L21N: J3.27
IO13_L21P: J3.29
IO13_L22N: J3.23
IO13_L22P: J3.25
IO34_25: J1.58
IO34_L7N: J1.23
IO34_L7P: J1.21
IO34_L8N: J1.19
IO34_L8P: J1.17
IO34_L11N: J1.41
IO34_L11P: J1.39
IO35_IO25: J2.10
IO35_L10N: J1.47
IO35_L10P: J1.45
IO35_L14P: J1.55
IO35_L21N: J2.11
IO35_L21P: J2.13
IO35_L22N: J2.7
IO35_L22P: J2.9
IO35_L23N: J2.3
IO35_L23P: J2.5
IOVDD: -2.1 C24.2 C25.2 C28.1 C52.1 C53.2 C54.1 C55.1 C77.2 C78.1 C89.2 C102.2 C103.2 C104.2 C110.2 C111.2 C116.1 C118.2 C119.1 J5.4 J7.1 J12.14 L2.2 OSC1.4 R1.1 R13.2 R14.1 R19.1 R23.1 R24.1 R26.2 R36.1 R37.1 R40.1 R41.1 R45.2 R66.2 R78.1 R79.1 R81.1 R82.1 R83.2 R90.2 R96.2 R111.2 R114.2 R116.2 R117.2 R118.2 R124.2 U11.2 U11.4 U12.12 U14.5 U15.4 U16.6 U16.37 U16.38 U16.41 U16.44 U16.45 U17.12 U18.8 U19.1 | length 3654.6
  Top Layer w6: U16.6@6509.47,4732.13 6544.42,4732.13 6547.29,4735 v2(6550,4735)
  Top Layer w8: U12.12@2578.9,5003.2 2578.9,5038.9 v2(2625,5085) ; U17.12@4618.9,5018.2 4620.4,5019.7 4620.4,5035.4 v2(4685,5100) ; v2(6370,4590) 6371.32,4591.32 6371.32,4625.47 U16.41@6371.38,4625.53 ; U16.44@6418.62,4625.53 6418.62,4601.38 v2(6430,4590) 6430,4592.16 6434.37,4596.53 U16.45@6434.37,4625.53
  Top Layer w10: U16.37@6308.39,4625.53 6308.39,4608.23 6315,4601.62 v2(6315,4600) 6324.13,4609.13 U16.38@6324.13,4625.53
  Top Layer w30: C28.1@1299.53,7225.47 R14.1@1299.53,7275.47 1418.98,7275.47 1423.5,7280 C25.2@1425,7280 1497.03,7280 1517.5,7300.47 L2.2@1525,7300.47 ; v2(1530,7255) 1530,7295.47 L2.2@1525,7300.47 ; -2.1@1610,7200.47 1610,7208.33 1595,7223.33 R13.2@1595,7295.94 1593.5,7295.94 1588.98,7300.47 L2.2@1525,7300.47 ; v2(1855,7350) 1855,7307.99 1886.06,7276.93 U11.4@1910,7276.93 U11.2@1910,7043.07 ; C54.1@1920,7460 1920,7604.13 1930.16,7614.29 C55.1@1930.16,7615 ; R36.1@2110,5184.92 v2(2110,5235) ; R37.1@2175,5184.92 v2(2175,5235) ; R40.1@2240,5184.92 v2(2240,5235) ; R41.1@2305,5184.92 2305.71,5184.92 2305.75,5184.96 2305.75,5185.67 2310,5189.92 v2(2310,5235) ; v2(2625,5085) 2629.25,5089.25 2629.25,5125.12 2629.29,5125.16 C78.1@2630,5125.16 ; R45.2@2730,8080.47 2731.5,8080.47 2756.02,8105 v2(2760,8105) ; R66.2@2779.92,4995 2825,4995 v2(2880.89,5050.89) ; U15.4@2790,8652.5 2780,8652.5 2765.75,8666.75 C89.2@2765.75,8707.28 ; v2(2810,8705) 2807.72,8707.28 C89.2@2765.75,8707.28 ; v2(3245,5855) 3264.88,5874.88 R1.1@3295,5874.92 R1.1@3295,5874.92 ; OSC1.4@3474.4,5137.04 3474.88,5137.52 R26.2@3474.92,5218.74 R26.2@3474.92,5218.74 ; R26.2@3474.96,5217.99 C53.2@3548.62,5217.99 ; C53.2@3550,5218.66 C53.2@3550,5218.66 3578.7,5218.7 v2(3595,5235) ; C52.1@3704.92,5218.66 C52.1@3705,5218.74 ; R23.1@3985,9009.53 4039.53,9009.53 v2(4040,9010) 4040.47,9009.53 R24.1@4090,9009.53 ; R78.1@4155,5204.92 v2(4155,5255) ; v2(4215,5255) 4219.25,5250.75 4219.25,5204.96 4219.29,5204.92 R79.1@4220,5204.92 ; R81.1@4285,5204.92 4285.71,5204.92 4285.75,5204.96 4285.75,5250.75 v2(4290,5255) ; R82.1@4350,5204.92 v2(4350,5255) ; C119.1@4675,5145.16 4675.71,5145.16 4675.75,5145.12 4675.75,5109.25 v2(4685,5100) ; R117.2@4819.92,4975 4819.92,4975.71 4879.21,5035 v2(4895,5035) ; v2(5395,7775) R19.1@5395,7810.08 ; v2(6010,4750) 6015.62,4755.62 6049.25,4755.62 6050.47,4756.84 C104.2@6050.47,4758.33 ; v2(6015,4565) R116.2@6050.47,4565 ; v2(6015,4610) 6047.14,4610 6047.76,4610.62 6049.25,4610.62 6050.47,4611.84 R114.2@6050.47,4613.33 ; v2(6015,4665) 6015.62,4664.38 6049.25,4664.38 6050.47,4663.16 C102.2@6050.47,4661.67 ; v2(6015,4710) C103.2@6050.47,4710 ; v2(6080,3820) 6094.25,3805.75 6094.25,3776.22 R90.2@6095.47,3775 R83.2@6095.47,3670 ; R96.2@6150,4972.72 v2(6150,5020) ; v2(6285,7230) R111.2@6325.47,7230 ; v2(6285,7330) R118.2@6325.47,7330 ; v2(6290,7420) R124.2@6325.47,7420 ; U19.1@6365,3545 6365,3567 6368,3570 v2(6420,3570) 6429.25,3560.75 C116.1@6462.28,3560.75 ; v2(6656.3,4830.98) C111.2@6690.83,4830.98 ; v2(6656.77,4780.98) C110.2@6691.3,4780.98 ; U18.8@7080,7415 7081.53,7415 7084.53,7418 C118.2@7084.53,7485 v2(7125,7485) ; v2(7170,6605) 7179.25,6614.25 7208.78,6614.25 C77.2@7210,6615.47 ; C77.2@7211.5,6615.47 7216.97,6610 U14.5@7275,6610 ; C89.2@2765.75,8707.28 2765.75,8708.78 C89.2@2764.53,8710 2764.53,8708.5 C89.2@2765.75,8707.28
  other v2: 1695,7265 1730,7265 1765,7265 1695,7310 1730,7310 1770,7310
J14: J2.20
J16: J2.14
J20: J2.23 R94.2 | length 1668.6
  Top Layer w8: J2.23@3375.43,6304.37 3376.2,6303.6 3376.2,6253.43 4182.62,5447 4327.2,5447 4545,5229.2 R94.2@4545,5204.92
K9: J3.28
K14: J2.22
K16: J2.16
K18: J2.37 R44.2 R91.2 | length 3618.6
  Top Layer w8: R44.2@2435,5184.92 2435,5372.83 2430,5377.84 2430,5380.91 3237.64,6188.55 J2.37@3237.64,6304.37 ; v2(4265,5400) 4325,5400 4480,5245 R91.2@4480,5204.92
  Bottom Layer w8: v2(2430,5380) 2450,5400 v2(4265,5400)
L10: J3.26
L16: 
L17: J2.41 R41.2 R82.2 U12.17 U17.17 | length 4302.8
  Top Layer w8: U12.17@2480.5,5003.2 2480.5,5036.06 2438.44,5078.12 2406,5078.12 2388.19,5095.92 2309.69,5095.92 2305,5100.61 R41.2@2305,5125.08 2305.79,5125.08 2340.25,5159.54 2340.25,5246.06 2335,5251.32 v2(2335,5360) 2762.63,5787.63 2772.17,5787.63 3198.27,6213.73 J2.41@3198.27,6304.37 ; v2(4270,5335) 4315,5335 4380,5270 4380,5174.29 4350.79,5145.08 R82.2@4350,5145.08 4352.2,5142.88 4352.2,5122.8 4379,5096 4484.46,5096 4520.3,5060.16 4520.3,5018.4 U17.17@4520.5,5018.2
  Bottom Layer w8: v2(2335,5360) 2356,5339 3660.53,5339 3669.53,5330 3966.18,5330 3971.18,5335 v2(4270,5335)
L19: J2.49
L20: J2.47
LCD_B0: J1.40
LCD_B1: J1.42
LCD_B2: J1.48
LCD_B3: J1.50
LCD_B4: J1.52
LCD_B5: J1.54
LCD_B6: J1.44
LCD_B7: J1.46
LCD_DE: J1.7
LCD_G0: J1.22
LCD_G1: J1.24
LCD_G2: J1.26
LCD_G3: J1.28
LCD_G4: J1.30
LCD_G5: J1.32
LCD_G6: J1.34
LCD_G7: J1.36
LCD_HSYNC: J1.3
LCD_PCLK: J1.9
LCD_R0: J1.4
LCD_R1: J1.6
LCD_R2: J1.8
LCD_R3: J1.10
LCD_R4: J1.12
LCD_R5: J1.14
LCD_R6: J1.16
LCD_R7: J1.18
LCD_VSYNC: J1.5
MCLK: R30.2 U12.7 U17.7 | length 2224.6
  Top Layer w8: U12.7@2628.1,4914.6 2628.3,4914.8 2649.8,4914.8 v2(2665,4930) ; v2(3480,4870) R30.2@3480,4908.82 ; U17.7@4668.1,4929.6 4668.3,4929.8 4695.85,4929.8 v2(4707.93,4941.87)
  Bottom Layer w8: v2(2665,4930) 3330,4930 3390,4870 v2(3480,4870) 3570,4870 3641.87,4941.87 v2(4707.93,4941.87)
N17: J3.13
N20: J3.5
NetC3_1: C3.1 U1.14 | length 100.7
  Top Layer w10: U1.14@1612.19,3210.59 1640.59,3210.59 1653.23,3223.23 1653.23,3263.48 C3.1@1663.23,3273.48
NetC4_2: C4.2 R5.1 R6.2 U2.3 | length 217.5
  Top Layer w10: R5.1@1315,2689.41 1450.89,2689.41 1453,2691.52 U2.3@1468.41,2691.52 ; R6.2@1375,2625.59 C4.2@1375,2688.82
NetC7_1: C7.1 U2.14 | length 90.1
  Top Layer w10: U2.14@1662.78,2717.11 1663.6,2717.93 1679.01,2717.93 1681.6,2720.53 1686.19,2720.53 1700.26,2734.61 1700.26,2745.85 C7.1@1724.41,2770
NetC8_1: C8.1 L1.1 U3.2 | length 208.8
  Top Layer w10: U3.2@1325.47,6912.95 1325.47,6910.98 1338.03,6898.42 1338.03,6894.93 1353.43,6879.53 C8.1@1430,6879.53 1474.53,6879.53 1480,6885 L1.1@1515,6885
NetC8_2: C8.2 U3.6 | length 69.6
  Top Layer w10: U3.6@1362.87,6814.53 1365.85,6817.5 1427.03,6817.5 C8.2@1430,6820.47
NetC13_2: C13.2 R9.2 R11.2 U3.4 | length 199.5
  Top Layer w10: R11.2@1195,6680.47 1240.94,6680.47 C13.2@1245.47,6685 R9.2@1245.47,6740 1245.47,6769.96 1288.07,6812.56 U3.4@1288.07,6814.53